# Altium PCB PCI Express Mini L1_V1.PCBDOC (part 2 of 9)
Units mm, origin at the board's own origin, x right, y up, seen from the top; angles counter-clockwise.
Board outline 70 x 83.2 mm, 6 copper layers (TopLayer, Layer 1, Layer 2, Layer 3, Layer 4, Bottom Layer), stack 0.914 mm thick; 442 components, 259 nets, 1412 pads, 857 vias.
Unrouted connection lines stored in the file: 2.
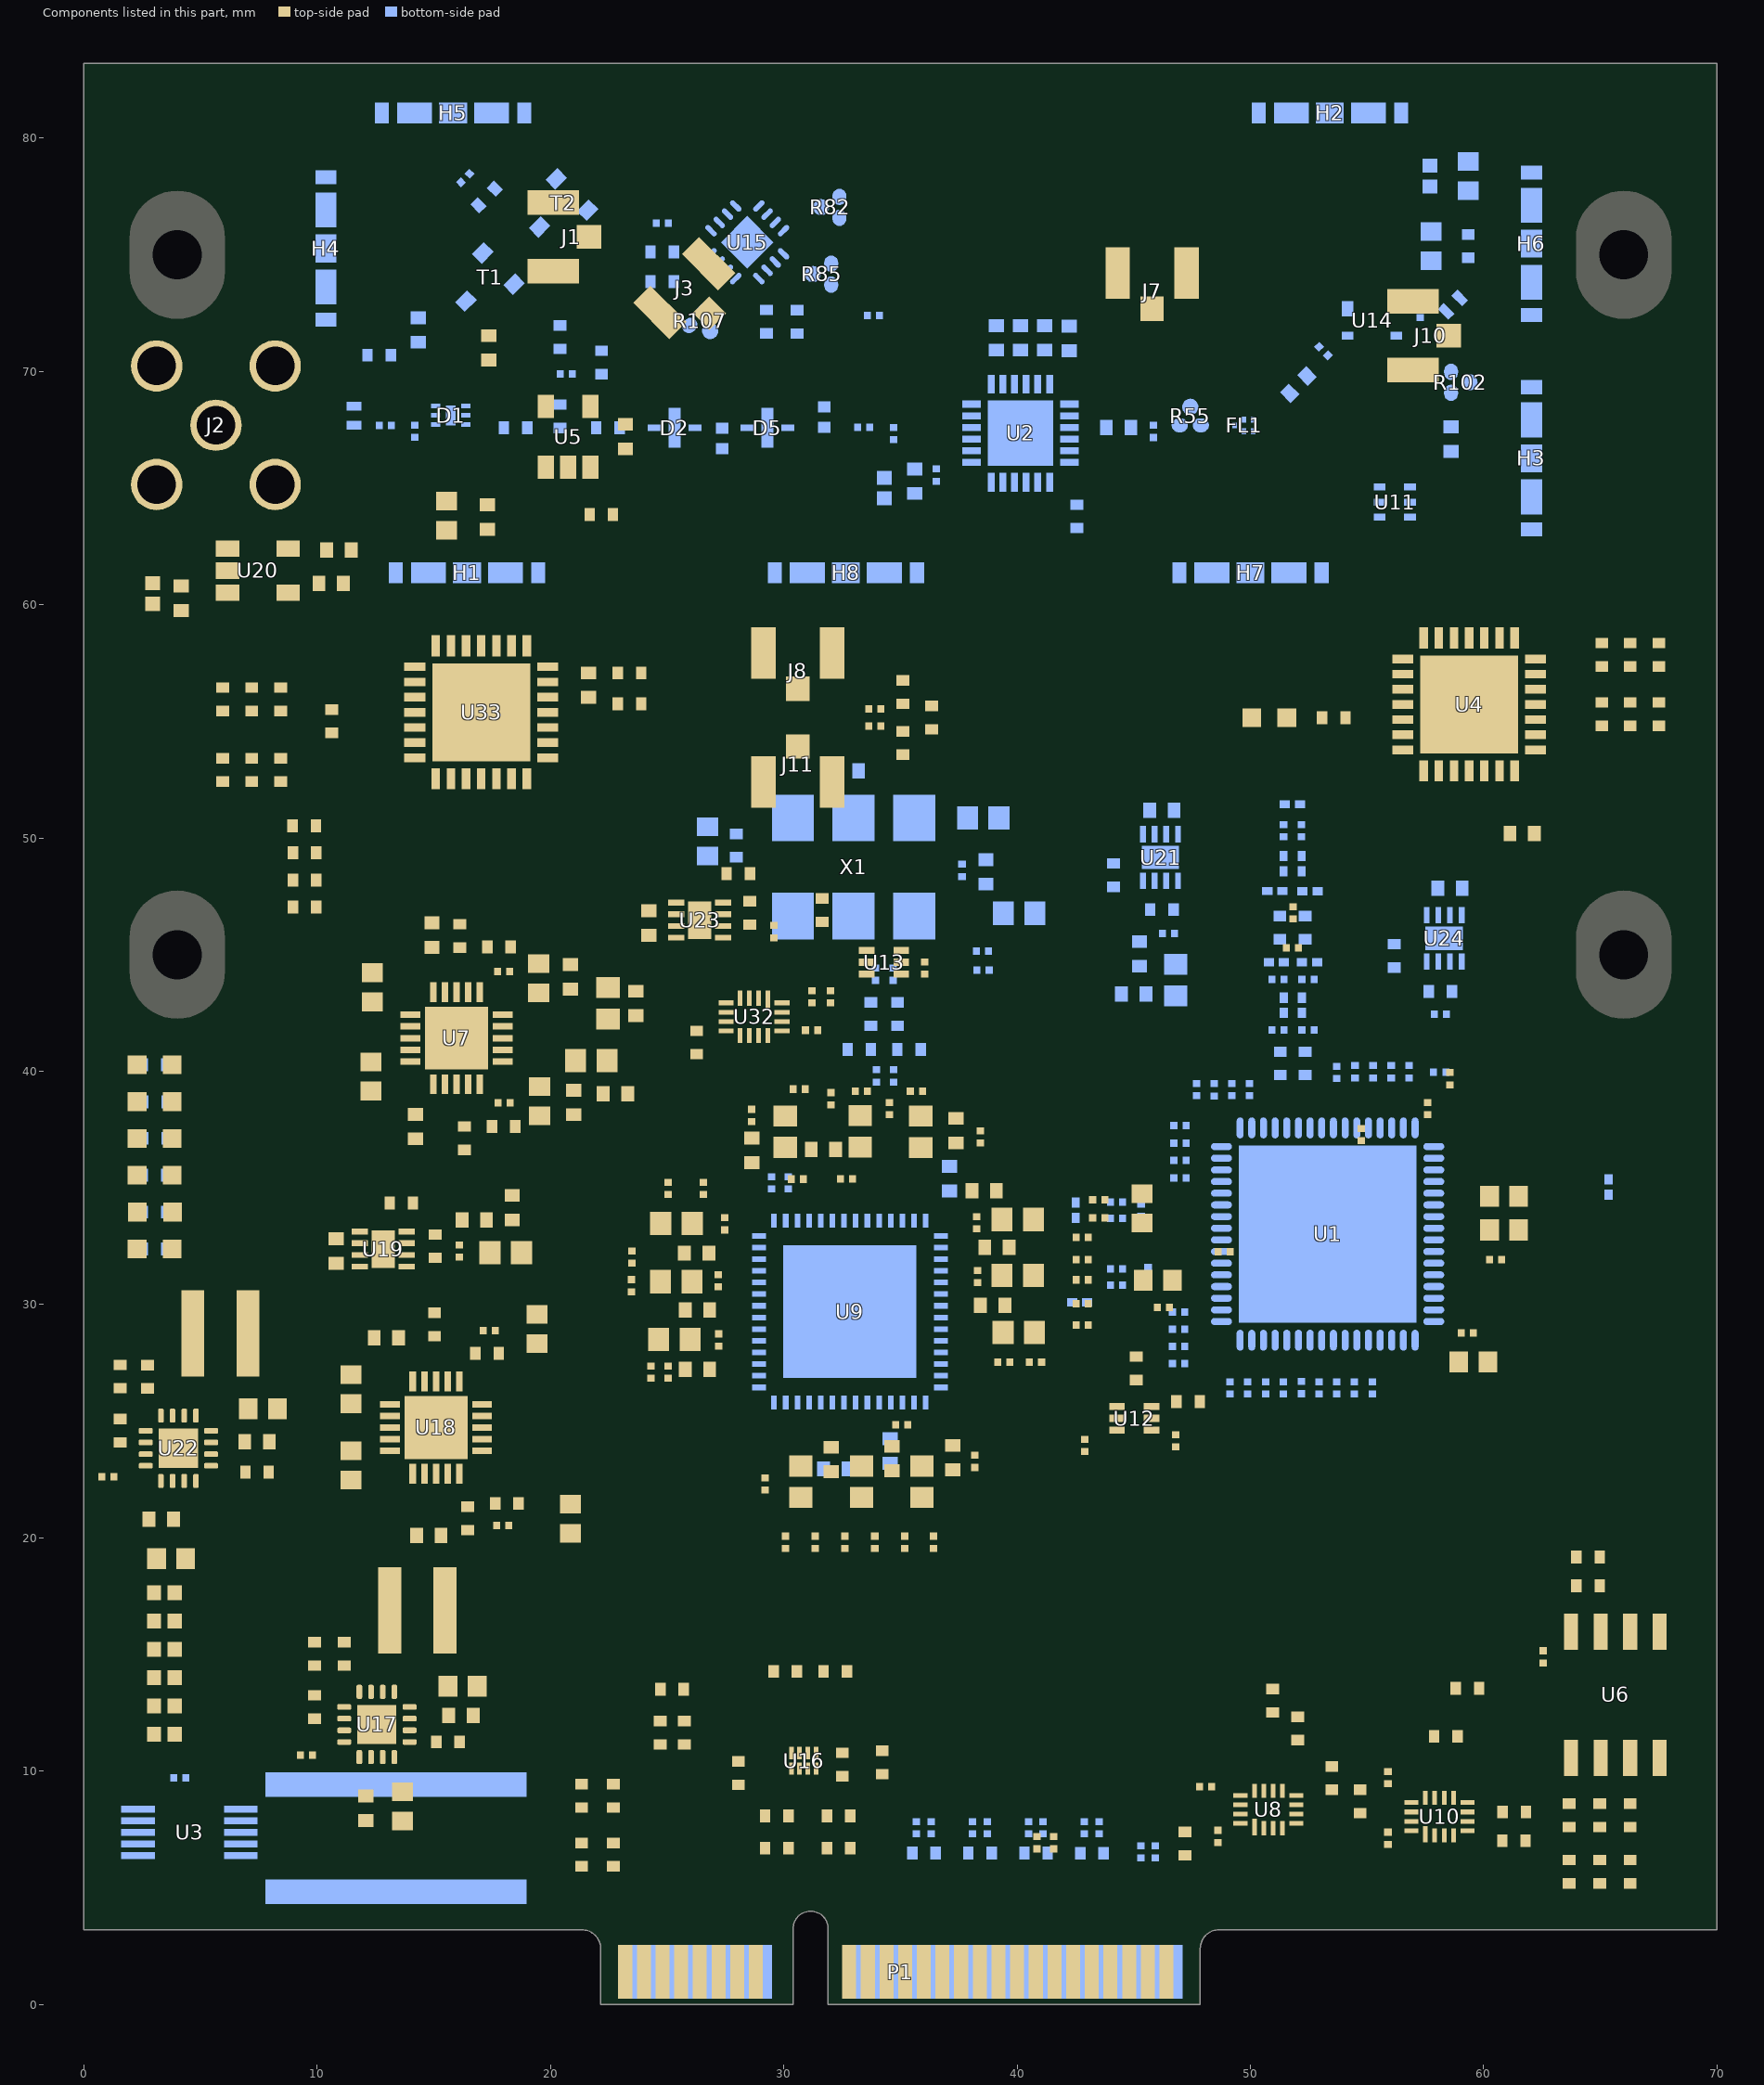
[diagram p6: the components of this part, seen from the top]

## Footprints (in the part's own frame and the unit in brackets; to place one, negate y for a bottom-side part, rotate by r counter-clockwise, add the part's x,y. Pads: shape width x height; smd on the part's side, far side on the other; paste and mask are expansions set on the pad) (continued)
ADL5910 [mm] "16-Lead Lead Frame Chip Scale Package [LFCSP]  3 mm × 3 mm Body and 0.75 mm Package Height  (CP-16-22)"
  oval 0.6x0.23 smd: 1(-1.45,0.75) 2(-1.45,0.25) 3(-1.45,-0.25) 4(-1.45,-0.75) 9(1.45,-0.75) 10(1.45,-0.25) 11(1.45,0.25) 12(1.45,0.75)
  oval 0.23x0.6 smd: 5(-0.75,-1.45) 6(-0.25,-1.45) 7(0.25,-1.45) 8(0.75,-1.45) 13(0.75,1.45) 14(0.25,1.45) 15(-0.25,1.45) 16(-0.75,1.45)
  rect 1.6x1.6 smd paste-0.05: 17(0,0)
  silkscreen extent -2.32,-1.55 1.55,1.55, body extent -1.55,-1.55 1.55,1.55, height 0.8
ADP124_125_KK [mm] "8-Lead Lead Frame Chip Scale Package [LFCSP_UD]  2 mm × 2 mm Body, Ultra Thin, Dual Lead  (CP-8-10)"
  rect 0.7x0.25 smd: 1(-1,0.75) 2(-1,0.25) 3(-1,-0.25) 4(-1,-0.75) 5(1,-0.75) 6(1,-0.25) 7(1,0.25) 8(1,0.75)
  rect 1x1.6 smd: 9(0,0)
  silkscreen extent -1.5,-1.2 1.05,1.25, body extent -1.15,-1.05 1.15,1.05, height 0.55
AP2210K-3.3TRG1 [mm] "SOT23, 5-Leads, Body 2.96x2.83mm, Pitch 0.95mm, IPC High Density"
  rect 1x0.7 smd: 1(-1.3,0.95) 2(-1.3,0) 3(-1.3,-0.95) 4(1.3,-0.95) 5(1.3,0.95)
  silkscreen extent -1.42,-1.55 0.45,1.97, body extent -1.5,-1.55 1.5,1.55, height 1.45
"CAP 0201/0603 KK"#1 [mm] "Chip Capacitor, 2-Leads, Body 0.60x0.30mm, IPC High Density"
  rect 0.3x0.32 smd mask+0.062: 1(-0.26,0) 2(0.26,0)
  silkscreen extent -0.58,-0.33 0.58,0.33, body extent -0.3,-0.15 0.3,0.15, height 0.3
"CAP 0201/0603 KK"#2 [mm] "Chip Capacitor, 2-Leads, Body 0.60x0.30mm, IPC High Density"
  rect 0.3x0.32 smd: 1(-0.26,0) 2(0.26,0)
  silkscreen extent -0.58,-0.33 0.58,0.33, body extent -0.3,-0.15 0.3,0.15, height 0.3
"CAP 0402/1005 RF KK" [mm] "Chip Capacitor, 2-Leads, Body 1.02x0.51mm, IPC High Density"
  rect 0.55x0.65 smd: 1(-0.525,0) 2(0.525,0)
  silkscreen extent -0.87,-0.45 0.87,0.45, body extent -0.5,-0.26 0.5,0.26, height 0.52
"CAP 0603/1608 RF" [mm] "Chip Capacitor, 2-Leads, Body 1.60x0.80mm, IPC High Density"
  rect 0.8x0.9 smd: 1(-0.625,0) 2(0.625,0)
  silkscreen extent -1.2,-0.63 1.2,0.63, body extent -0.8,-0.41 0.8,0.41, height 0.82
CLA4611-085LF [mm] "PSON, 2-Leads, Body 2,00x2,00mm, Pitch 0,00mm, Thermal Pad 1,70x0,50mm, IPC High Density"
  rect 0.55x0.27 smd: 1(0.875,0) 3(-0.875,0)
  rect 0.5x1.7 smd: 2(0,0)
  silkscreen extent -1.6,-1.15 1.15,1.2, body extent -1,-1 1,1, height 1
FCSL110R005FERCT-ND [mm] "Wide 4320 (11050 Metric), 2043"
  rect 1.05x11.2 smd: 1(-2.3,0) 2(2.3,0)
  silkscreen extent -1.4,-5.5 1.4,5.5, body extent -2.8,-5.6 2.8,5.6, height 0.8
"FER 0402/1005 KK" [mm] "Chip Ferrite, 2-Leads, Body 1.02x0.51mm, IPC Medium Density"
  rect 0.6x0.64 smd: 1(-0.44,0) 2(0.44,0)
  silkscreen extent -1,-0.5 1,0.5, body extent -0.5,-0.26 0.5,0.26, height 0.52
"FER 0603/1608 KK" [mm] "Chip Ferrite, 2-Leads, Body 1.60x0.80mm, IPC Medium Density"
  rect 0.9x1 smd: 1(-0.675,0) 2(0.675,0)
  silkscreen extent -1.4,-0.7 1.4,0.7, body extent -0.8,-0.41 0.8,0.41, height 0.82
GPS05605 [mm] "SOT343, 4-Leads, Body 2,00x2,15mm, Pitch 1,30mm, IPC High Density"
  rect 0.5x0.35 smd: 1(-1.05,0.65) 3(1.05,-0.65) 4(1.05,0.65)
  rect 0.5x0.65 smd: 2(-1.05,-0.5)
  silkscreen extent -1.1,-1 0.65,1.17, body extent -1.22,-1 1.22,1, height 0.9
HMC472ALP4E [mm] "24-VFQFN Exposed Pad"
  rect 0.8x0.3 smd mask+0.075: 1(-2.1,1.25) 2(-2.1,0.75) 3(-2.1,0.25) 4(-2.1,-0.25) 5(-2.1,-0.75) 6(-2.1,-1.25) 13(2.1,-1.25) 14(2.1,-0.75) 15(2.1,-0.25) 16(2.1,0.25) 17(2.1,0.75) 18(2.1,1.25)
  rect 0.3x0.8 smd mask+0.075: 7(-1.25,-2.1) 8(-0.75,-2.1) 9(-0.25,-2.1) 10(0.25,-2.1) 11(0.75,-2.1) 12(1.25,-2.1) 19(1.25,2.1) 20(0.75,2.1) 21(0.25,2.1) 22(-0.25,2.1) 23(-0.75,2.1) 24(-1.25,2.1)
  rect 2.8x2.8 smd paste-0.1 mask+0.075: 25(0,0)
  silkscreen extent -2.82,-2.05 2.05,2.05, body extent -2.05,-2.05 2.05,2.05, height 0.39
INA226 [mm] "TSSOP, 10-Leads, Body 3,00x3,00mm, Pitch 0,50mm, IPC Medium Density"
  rect 1.45x0.3 smd: 1(-2.2,1) 2(-2.2,0.5) 3(-2.2,0) 4(-2.2,-0.5) 5(-2.2,-1) 6(2.2,-1) 7(2.2,-0.5) 8(2.2,0) 9(2.2,0.5) 10(2.2,1)
  silkscreen extent -2.32,-1.55 1.15,1.82, body extent -2.45,-1.55 2.45,1.55, height 1.1
"IND 0402/1005 RF WW" [mm]
  rect 0.48x0.54 smd: 1(-0.44,0) 2(0.44,0)
  silkscreen extent -0.87,-0.45 0.87,0.45, body extent -0.5,-0.29 0.5,0.29, height 0.51
"LED 0603/1608 GREEN" [mm] "Chip Diode, 2-Leads, Body 1.60x0.80mm, IPC Medium Density"
  rect 0.8x0.8 smd: 1(-0.75,0) 2(0.75,0)
  silkscreen extent -1.52,-0.7 1.52,0.7, body extent -0.8,-0.4 0.8,0.4, height 0.53
LMK04610 [mm] "PQFN, 56-Leads, Body 8,00x8,00mm, Pitch 0,50mm, Thermal Pad 5,70x5,70mm, IPC High Density"
  rect 0.6x0.24 smd: 1(-3.9,3.25) 2(-3.9,2.75) 3(-3.9,2.25) 4(-3.9,1.75) 5(-3.9,1.25) 6(-3.9,0.75) 7(-3.9,0.25) 8(-3.9,-0.25) 9(-3.9,-0.75) 10(-3.9,-1.25) 11(-3.9,-1.75) 12(-3.9,-2.25) 13(-3.9,-2.75) 14(-3.9,-3.25) 29(3.9,-3.25) 30(3.9,-2.75) 31(3.9,-2.25) 32(3.9,-1.75) 33(3.9,-1.25) 34(3.9,-0.75) 35(3.9,-0.25) 36(3.9,0.25) 37(3.9,0.75) 38(3.9,1.25) 39(3.9,1.75) 40(3.9,2.25) 41(3.9,2.75) 42(3.9,3.25)
  rect 0.24x0.6 smd: 15(-3.25,-3.9) 16(-2.75,-3.9) 17(-2.25,-3.9) 18(-1.75,-3.9) 19(-1.25,-3.9) 20(-0.75,-3.9) 21(-0.25,-3.9) 22(0.25,-3.9) 23(0.75,-3.9) 24(1.25,-3.9) 25(1.75,-3.9) 26(2.25,-3.9) 27(2.75,-3.9) 28(3.25,-3.9) 43(3.25,3.9) 44(2.75,3.9) 45(2.25,3.9) 46(1.75,3.9) 47(1.25,3.9) 48(0.75,3.9) 49(0.25,3.9) 50(-0.25,3.9) 51(-0.75,3.9) 52(-1.25,3.9) 53(-1.75,3.9) 54(-2.25,3.9) 55(-2.75,3.9) 56(-3.25,3.9)
  rect 5.7x5.7 smd paste-2.85 mask+0.102: 57(0,0)
  rect 1.15x1.15 on Bottom Paste: ""(-2.025,-2.025) ""(-2.025,-0.675) ""(-2.025,0.675) ""(-2.025,2.025) ""(-0.675,-2.025) ""(-0.675,-0.675) ""(-0.675,0.675) ""(-0.675,2.025) ""(0.675,-2.025) ""(0.675,-0.675) ""(0.675,0.675) ""(0.675,2.025) ""(2.025,-2.025) ""(2.025,-0.675) ""(2.025,0.675) ""(2.025,2.025)
  silkscreen extent -4.85,-4.08 4.08,4.08, body extent -4.08,-4.08 4.08,4.08, height 1
MCP23017/MCP23S17#1 [mm] "QFN, 28-Leads, Body 6,00x6,00mm, Pitch 0,65mm, Thermal Pad 4,25x4,25mm, IPC High Density"
  rect 0.9x0.37 smd: 1(-2.85,1.95) 2(-2.85,1.3) 3(-2.85,0.65) 4(-2.85,0) 5(-2.85,-0.65) 6(-2.85,-1.3) 7(-2.85,-1.95) 15(2.85,-1.95) 16(2.85,-1.3) 17(2.85,-0.65) 18(2.85,0) 19(2.85,0.65) 20(2.85,1.3) 21(2.85,1.95)
  rect 0.37x0.9 smd: 8(-1.95,-2.85) 9(-1.3,-2.85) 10(-0.65,-2.85) 11(0,-2.85) 12(0.65,-2.85) 13(1.3,-2.85) 14(1.95,-2.85) 22(1.95,2.85) 23(1.3,2.85) 24(0.65,2.85) 25(0,2.85) 26(-0.65,2.85) 27(-1.3,2.85) 28(-1.95,2.85)
  rect 4.2x4.2 smd: 29(0,0)
  silkscreen extent -3.92,-3.15 3.15,3.15, body extent -3,-3 3,3, height 1
MCP23017/MCP23S17#2 [mm] "QFN, 28-Leads, Body 6,00x6,00mm, Pitch 0,65mm, Thermal Pad 4,25x4,25mm, IPC High Density"
  rect 0.9x0.37 smd: 1(-2.85,1.95) 2(-2.85,1.3) 3(-2.85,0.65) 4(-2.85,0) 5(-2.85,-0.65) 6(-2.85,-1.3) 7(-2.85,-1.95) 15(2.85,-1.95) 16(2.85,-1.3) 17(2.85,-0.65) 18(2.85,0) 19(2.85,0.65) 20(2.85,1.3) 21(2.85,1.95)
  rect 0.37x0.9 smd: 8(-1.95,-2.85) 9(-1.3,-2.85) 10(-0.65,-2.85) 11(0,-2.85) 12(0.65,-2.85) 13(1.3,-2.85) 14(1.95,-2.85) 22(1.95,2.85) 23(1.3,2.85) 24(0.65,2.85) 25(0,2.85) 26(-0.65,2.85) 27(-1.3,2.85) 28(-1.95,2.85)
  rect 4.2x4.2 smd paste-2.125: 29(0,0)
  silkscreen extent -3.93,-3.15 3.15,3.15, body extent -3,-3 3,3, height 1
ODS-1415 [mm]
  rect 0.4x0.2 smd: 1(-0.65,0.4) 2(-0.65,0) 3(-0.65,-0.4) 4(0.65,-0.4) 5(0.65,0) 6(0.65,0.4)
  rect 0.42x0.85 smd: 7(0,0)
  silkscreen extent -1.11,0.66 -1.01,0.76, body extent -0.75,-0.6 0.75,0.6, height 0.6
PCA9306 [mm] "8-XFDFN, Body 1,40x1,00mm, Pitch 0,35mm, IPC High Density"
  rect 0.53x0.2 smd: 1(-0.335,0.525) 2(-0.335,0.175) 3(-0.335,-0.175) 4(-0.335,-0.525) 5(0.335,-0.525) 6(0.335,-0.175) 7(0.335,0.175) 8(0.335,0.525)
  silkscreen extent -0.86,0.79 -0.76,0.89, body extent -0.53,-0.73 0.53,0.72, height 0.4
PCIeMini-GF-2D-800-1K-S52 [mm] "Golden finger, PCIeMini, Dual, Staggered, Pitch 0.8mm, 52-Position"
  rect 0.6x2.3 smd paste-0.9: 1(-11.8,0) 3(-11,0) 5(-10.2,0) 7(-9.4,0) 9(-8.6,0) 11(-7.8,0) 13(-7,0) 15(-6.2,0) 17(-2.2,0) 19(-1.4,0) 21(-0.6,0) 23(0.2,0) 25(1,0) 27(1.8,0) 29(2.6,0) 31(3.4,0) 33(4.2,0) 35(5,0) 37(5.8,0) 39(6.6,0) 41(7.4,0) 43(8.2,0) 45(9,0) 47(9.8,0) 49(10.6,0) 51(11.4,0)
  rect 0.6x2.3 smd far side paste-0.9: 2(-11.4,0) 4(-10.6,0) 6(-9.8,0) 8(-9,0) 10(-8.2,0) 12(-7.4,0) 14(-6.6,0) 16(-5.8,0) 18(-1.8,0) 20(-1,0) 22(-0.2,0) 24(0.6,0) 26(1.4,0) 28(2.2,0) 30(3,0) 32(3.8,0) 34(4.6,0) 36(5.4,0) 38(6.2,0) 40(7,0) 42(7.8,0) 44(8.6,0) 46(9.4,0) 48(10.2,0) 50(11,0) 52(11.8,0)
"RES 0201/0603"#1 [mm] "Chip Resistor, 2-Leads, Body 0.60x0.30mm, IPC Medium Density"
  rect 0.44x0.35 smd mask+0.055: 1(-0.325,0) 2(0.325,0)
  silkscreen extent -0.7,-0.33 0.7,0.33, body extent -0.3,-0.15 0.3,0.15, height 0.21
"RES 0201/0603"#2 [mm]
  rect 0.44x0.35 smd: 1(-0.325,0) 2(0.325,0)
  silkscreen extent -0.7,-0.33 0.7,0.33, body extent -0.3,-0.15 0.3,0.15, height 0.21
"RES 0402/1005 RF - 3-PADS"#1 [mm] "Chip Resistor, 2-Leads, Body 1.0x0.5mm, IPC High Density"
  oval 0.7x0.6 smd: 1(-0.45,0) 2(0.45,0)
  round 0.7 smd: 3(0,0.787)
  silkscreen extent -1.02,-0.5 1.02,1.34, body extent -0.5,-0.25 0.5,0.25, height 0.35
"RES 0402/1005 RF - 3-PADS"#2 [mm] "Chip Resistor, 2-Leads, Body 1.0x0.5mm, IPC High Density"
  oval 0.7x0.6 smd: 1(-0.45,0) 2(0.45,0)
  round 0.7 smd paste-2: 3(0,0.787)
  silkscreen extent -1.02,-0.5 1.02,1.34, body extent -0.5,-0.25 0.5,0.25, height 0.35
"RES 0402/1005 RF KK" [mm] "Chip Resistor, 2-Leads, Body 1.0x0.5mm, IPC High Density"
  rect 0.45x0.55 smd: 1(-0.5,0) 2(0.5,0)
  silkscreen extent -1.02,-0.51 1.02,0.51, body extent -0.5,-0.25 0.5,0.25, height 0.35
ROS-32K101-400L5_V [mm] "SMA Straight Jack, 6.35x6.35x9.5mm, Rosenberger Recommended"
  round 2.2 hole 1.65: 1(0,0) MH(-2.54,-2.54) MH(-2.54,2.54) MH(2.54,-2.54) MH(2.54,2.54)
  silkscreen extent -3.17,-3.18 3.18,3.17, body extent -3.17,-3.17 3.18,3.18, height 9.5
SI2342DS-T1-GE3 [mm] "SOT23, 3-Leads, Body 2,92x2,37mm, Pitch 0,95mm, IPC High Density"
  rect 0.724x0.6 smd: 1(-0.984,0.95) 2(-0.984,-0.95) 3(0.984,0)
  silkscreen extent -1.11,-1.5 0.7,1.92, body extent -1.32,-1.52 1.32,1.52, height 1.12
TA1954A [mm] "5-Leads, Body 0,90x1,10mm"
  rect 0.2x0.25 smd: A(0.4,0) B(0,-0.25) C(-0.4,-0.25) D(-0.4,0.25) E(0,0.25)
  silkscreen extent -0.55,-0.6 0.93,0.6, body extent -0.55,-0.45 0.55,0.45, height 0.95
TECO-1909763-1_V [mm] "SMD, 3-Leads, Body 2.6x2.6mm, Height 1.25mm"
  rect 1.05x2.2 smd: 1(-1.475,0) 3(1.475,0)
  rect 1x1.05 smd: 2(0,-1.525)
  silkscreen extent -1.9,-1.78 0.55,1.3, body extent -1.5,-1.55 1.5,1.55, height 1.25
TPS7A88 [mm] "RTJ (S-PWQFN-N20) 20-Leads, Body 4,00x4,00mm, Pitch 0,50mm, Thermal Pad 2,70x2,70mm, IPC High Density"
  rect 0.85x0.28 smd: 1(-1.975,1) 2(-1.975,0.5) 3(-1.975,0) 4(-1.975,-0.5) 5(-1.975,-1) 11(1.975,-1) 12(1.975,-0.5) 13(1.975,0) 14(1.975,0.5) 15(1.975,1)
  rect 0.28x0.85 smd: 6(-1,-1.975) 7(-0.5,-1.975) 8(0,-1.975) 9(0.5,-1.975) 10(1,-1.975) 16(1,1.975) 17(0.5,1.975) 18(0,1.975) 19(-0.5,1.975) 20(-1,1.975)
  rect 2.7x2.7 smd: 21(0,0)
  silkscreen extent -2.85,-2.07 2.07,2.07, body extent -2.07,-2.07 2.07,2.07, height 0.8
TXB0304 [mm] "RSV0016A UQFN - 0.55 mm max height"
  rect 0.75x0.2 smd: 1(-0.75,0.6)
  rect 0.65x0.2 smd: 2(-0.8,0.2) 3(-0.8,-0.2) 4(-0.8,-0.6) 9(0.8,-0.6) 10(0.8,-0.2) 11(0.8,0.2) 12(0.8,0.6)
  rect 0.2x0.65 smd: 5(-0.6,-1.2) 6(-0.2,-1.2) 7(0.2,-1.2) 8(0.6,-1.2) 13(0.6,1.2) 14(0.2,1.2) 15(-0.2,1.2) 16(-0.6,1.2)
  silkscreen extent -1.27,1.58 -1.18,1.68, body extent -0.92,-1.33 0.92,1.33, height 0.55
VG-4513CA [mm] "SON, 6-Leads, Body 7,00x5,00mm, Pitch 2,60mm, IPC High Density"
  rect 2x1.8 smd: 1(-2.1,2.6) 2(-2.1,0) 3(-2.1,-2.6) 4(2.1,-2.6) 5(2.1,0) 6(2.1,2.6)
  silkscreen extent -3.36,3.66 -3.26,3.76, body extent -2.6,-3.6 2.6,3.6, height 1.8
VQFN50P300x300-16-EPAD [mm] "VQFN"
  rrect50% 0.6x0.24 smd mask+0.07: 1(-1.4,0.75) 2(-1.4,0.25) 3(-1.4,-0.25) 4(-1.4,-0.75) 9(1.4,-0.75) 10(1.4,-0.25) 11(1.4,0.25) 12(1.4,0.75)
  rrect50% 0.24x0.6 smd mask+0.07: 5(-0.75,-1.4) 6(-0.25,-1.4) 7(0.25,-1.4) 8(0.75,-1.4) 13(0.75,1.4) 14(0.25,1.4) 15(-0.25,1.4) 16(-0.75,1.4)
  rect 1.68x1.68 smd paste-0.075: 17(0,0)
  silkscreen extent -2.32,-1.55 1.55,1.55, body extent -1.55,-1.55 1.55,1.55, height 1
WE-KI_0402 [mm] "SMD Wire Wound Ceramic Inductor, body 1x0.55mm"
  rect 0.375x0.65 smd: 1(-0.412,0) 2(0.413,0)
  body extent -0.5,-0.27 0.5,0.28, height 0.58
WE-MAPI_4030 [mm] "SMT Shielded Power Inductor, body 4.1x4.1mm"
  rect 0.98x3.7 smd: 1(-1.185,0) 2(1.185,0)
  silkscreen extent -2.15,-2.15 2.15,2.15, body extent -2.05,-2.05 2.05,2.05, height 3.1

## Part data
C1 C7: library part Capacitor, Case Code (Imperial)=0201, Case Code (Metric)=0603, Dielectric=C0G, Manufacturer 1=Murata, Manufacturer Part Number 1=GJM0335C1E4R0CB01D, Max Operating Temperature=125°C, Min Operating Temperature=-55°C, Package Quantity=1, Supplier Part Number 1=490-3068-1-ND, Voltage Rating=25V, Capacitance=4pF, Case/Package=0201, ComponentLink1Description=https://datasheet.ciiva.com/133/product-133426.pdf?src-supplier=Digi-Key, ComponentLink1URL=https://datasheet.ciiva.com/133/product-133426.pdf?src-supplier=Digi-Key, ComponentLink2Description=https://datasheet.ciiva.com/133/partnumbering-e-01-133427.pdf?src-supplier=Digi-Key, ComponentLink2URL=https://datasheet.ciiva.com/133/partnumbering-e-01-133427.pdf?src-supplier=Digi-Key, ComponentLink3Description=https://datasheet.ciiva.com/133/partnumbering-e-01-133428.pdf?src-supplier=Digi-Key, ComponentLink3URL=https://datasheet.ciiva.com/133/partnumbering-e-01-133428.pdf?src-supplier=Digi-Key, ComponentLink4Description=https://datasheet.ciiva.com/16467/l0005e-16467449.pdf?src-supplier=Future+Electronics, ComponentLink4URL=https://datasheet.ciiva.com/16467/l0005e-16467449.pdf?src-supplier=Future+Electronics, ComponentLink5Description=https://datasheet.ciiva.com/11613/product-11613563.pdf?src-supplier=Avnet, ComponentLink5URL=https://datasheet.ciiva.com/11613/product-11613563.pdf?src-supplier=Avnet, Depth=0.3mm, Height=0.3mm, Lead Free="Lead Free", Length=0.6mm, Mount="Surface Mount", Packaging="Tape and Reel", Pricing 1="1=0.10000, 10=0.07300, 100=0.03240, 500=0.02318, 1000=0.01821, 2500=0.01655, 5000=0.01523 (USD)", Radiation Hardening=No, RoHS=Yes, Stock 1=33697, Supplier 1=Digi-Key, Termination=SMD/SMT, Thickness=0.013inch, Voltage Rating (DC)=25V, Width=0.012inch
C2 C5 C8: library part Capacitor, Case Code (Imperial)=0201, Case Code (Metric)=0603, Dielectric=C0G, Manufacturer 1=Murata, Manufacturer Part Number 1=GRM0335C1E1R0CA01D, Max Operating Temperature=125°C, Min Operating Temperature=-55°C, Package Quantity=15000, Supplier Part Number 1=490-7749-1-ND, Voltage Rating=25V, Capacitance=1pF, Case/Package=0201, ComponentLink1Description=https://datasheet.ciiva.com/29540/partnumbering-e-01-29540585.pdf?src-supplier=Digi-Key, ComponentLink1URL=https://datasheet.ciiva.com/29540/partnumbering-e-01-29540585.pdf?src-supplier=Digi-Key, ComponentLink2Description=https://datasheet.ciiva.com/29540/partnumbering-e-01-29540586.pdf?src-supplier=Digi-Key, ComponentLink2URL=https://datasheet.ciiva.com/29540/partnumbering-e-01-29540586.pdf?src-supplier=Digi-Key, ComponentLink3Description=https://datasheet.ciiva.com/29540/partnumbering-e-01-29540587.pdf?src-supplier=Digi-Key, ComponentLink3URL=https://datasheet.ciiva.com/29540/partnumbering-e-01-29540587.pdf?src-supplier=Digi-Key, Depth=0.3mm, Height=0.3mm, Lead Free="Lead Free", Length=0.6mm, Mount="Surface Mount", Packaging="Tape and Reel", Pricing 1="1=0.10000, 10=0.01500, 100=0.00680, 500=0.00484, 1000=0.00380, 2500=0.00345, 5000=0.00317 (USD)", REACH SVHC="No SVHC", RoHS=Yes, Stock 1=33122, Supplier 1=Digi-Key, Termination=SMD/SMT, Thickness=0.013inch, Voltage Rating (DC)=25V, Width=0.012inch
C3 C4 C6 C41 C44 C45 C53 C56 C175 C176 C178 C179 C183 C185 C186 C187 C188 C189 C223 C224 C225 C226 C227 C228: library part Capacitor, Case Code (Imperial)=0201, Case Code (Metric)=0603, Dielectric=X5R, Manufacturer 1=Yageo, Manufacturer Part Number 1=CC0201KRX5R6BB104, Max Operating Temperature=85°C, Min Operating Temperature=-55°C, Supplier Part Number 1=311-1593-1-ND, Tolerance=10%, Voltage Rating=10V, Capacitance=100nF, Case/Package=0201, ComponentLink1Description=https://datasheet.ciiva.com/17437/upy-gphc-x5r-4v-to-50v-12-17437495.pdf?src-supplier=Avnet+Europe, ComponentLink1URL=https://datasheet.ciiva.com/17437/upy-gphc-x5r-4v-to-50v-12-17437495.pdf?src-supplier=Avnet+Europe, ComponentLink2Description=https://datasheet.ciiva.com/11587/upy-gphc-x5r-4v-to-50v-12-11587190.pdf?src-supplier=Avnet, ComponentLink2URL=https://datasheet.ciiva.com/11587/upy-gphc-x5r-4v-to-50v-12-11587190.pdf?src-supplier=Avnet, Composition=Ceramic, Depth=0.3mm, Halogen Free="Halogen Free", Height=0.3mm, Lead Free="Lead Free", Length=0.6mm, Mount="Surface Mount", Packaging="Tape and Reel", Pricing 1="1=0.10000, 10=0.03800, 100=0.01690, 500=0.01208, 1000=0.00949, 2500=0.00862, 5000=0.00794 (USD)", Radiation Hardening=No, RoHS=Yes, Stock 1=1229391, Supplier 1=Digi-Key, Termination=SMD/SMT, Thickness=0.013inch, Voltage Rating (DC)=10V, Weight=6E-06oz, Width=0.012inch
C9 C15 C16 C17 C18 C19 C20 C23 C26 C35 C36 C38 C39 C50 C69 C84 C85 C88 C89 C94 C95 C99 C100 C101 C102 C103 C104 C105 C106 C107 C108 C109 C110 C111 C113 C114 C115 C116 C117 C118 C119 C120 C121 C122 C123 C124 C125 C132 C133 C134 C136 C137 C138 C139 C150 C151 C152 C154 C155 C156 C158 C159 C160 C162 C163 C164 C166 C167 C174 C181 C182 C184 C191 C192 C193 C195 C196 C197 C199 C200 C201 C203 C204 C205 C207 C208 C209 C211 C212 C213 C215 C216 C217 C239 C240 C243 C244: library part Capacitor, Case Code (Imperial)=0201, Case Code (Metric)=0603, Dielectric=X5R, Manufacturer 1=Murata, Manufacturer Part Number 1=GRM033R61C104ME84D, Max Operating Temperature=85°C, Min Operating Temperature=-55°C, Package Quantity=15000, Supplier Part Number 1=490-9986-1-ND, Tolerance=20%, Voltage Rating=16V, Capacitance=100nF, Case/Package=0201, Height=0.3mm, Length=0.024inch, Mount="Surface Mount", Packaging="Tape and Reel", Pricing 1="1=0.10000, 10=0.05400, 100=0.02430, 500=0.01732, 1000=0.01361, 2500=0.01238, 5000=0.01139 (USD)", RoHS=Yes, Supplier 1=Digi-Key, Termination=SMD/SMT, Thickness=0.013inch, Voltage Rating (DC)=16V, Weight=1.2E-05oz, Width=0.3mm
  C9 C19 C20 C23 C26 C94 C95 C132 C133 C134 C136 C137 C138 C139 C239 C240 C243 C244: ComponentLink1Description=http://www.mouser.com/ds/2/281/c02e-2905.pdf?src-supplier=Mouser, ComponentLink1URL=http://www.mouser.com/ds/2/281/c02e-2905.pdf?src-supplier=Mouser, ComponentLink2Description=http://search.murata.co.jp/Ceramy/image/img/A01X/G101/ENG/GRM033R61C104ME84-01.pdf?src-supplier=Digi-Key, ComponentLink2URL=http://search.murata.co.jp/Ceramy/image/img/A01X/G101/ENG/GRM033R61C104ME84-01.pdf?src-supplier=Digi-Key, Stock 1=550070
  C15 C16 C17 C18 C35 C36 C38 C39: ComponentLink1Description=http://www.mouser.com/ds/2/281/c02e-2905.pdf?src-supplier=Mouser, ComponentLink1URL=http://www.mouser.com/ds/2/281/c02e-2905.pdf?src-supplier=Mouser, ComponentLink2Description=http://search.murata.co.jp/Ceramy/image/img/A01X/G101/ENG/GRM033R61C104ME84-01.pdf?src-supplier=Digi-Key, ComponentLink2URL=http://search.murata.co.jp/Ceramy/image/img/A01X/G101/ENG/GRM033R61C104ME84-01.pdf?src-supplier=Digi-Key, Stock 1=502660
  C50 C84 C85 C150 C151 C152 C154 C155 C156 C158 C159 C160 C162 C163 C164 C166 C167 C174 C181 C182 C184 C191 C192 C193 C195 C196 C197 C199 C200 C201 C203 C204 C205 C207 C208 C209 C211 C212 C213 C215 C216 C217: ComponentLink1Description=http://www.mouser.com/ds/2/281/c02e-2905.pdf?src-supplier=Mouser, ComponentLink1URL=http://www.mouser.com/ds/2/281/c02e-2905.pdf?src-supplier=Mouser, ComponentLink2Description=http://search.murata.co.jp/Ceramy/image/img/A01X/G101/ENG/GRM033R61C104ME84-01.pdf?src-supplier=Digi-Key, ComponentLink2URL=http://search.murata.co.jp/Ceramy/image/img/A01X/G101/ENG/GRM033R61C104ME84-01.pdf?src-supplier=Digi-Key, Stock 1=503570
  C69 C88 C89 C99 C100 C101 C102 C103 C104 C105 C106 C107 C108 C109 C110 C111 C113 C114 C115 C116 C117 C118 C119 C120 C121 C122 C123 C124 C125: ComponentLink1Description=http://search.murata.co.jp/Ceramy/image/img/A01X/G101/ENG/GRM033R61C104KE84-01.pdf?src-supplier=Digi-Key, ComponentLink1URL=http://search.murata.co.jp/Ceramy/image/img/A01X/G101/ENG/GRM033R61C104KE84-01.pdf?src-supplier=Digi-Key, ComponentLink2Description=https://search.murata.co.jp/Ceramy/image/img/A01X/G101/ENG/GRM033R61C104KE84-01.pdf?src-supplier=Digi-Key, ComponentLink2URL=https://search.murata.co.jp/Ceramy/image/img/A01X/G101/ENG/GRM033R61C104KE84-01.pdf?src-supplier=Digi-Key, ComponentLink3Description=http://www.mouser.com/ds/2/281/c02e-2905.pdf?src-supplier=Mouser, ComponentLink3URL=http://www.mouser.com/ds/2/281/c02e-2905.pdf?src-supplier=Mouser, ComponentLink4Description=http://search.murata.co.jp/Ceramy/image/img/A01X/G101/ENG/GRM033R61C104ME84-01.pdf?src-supplier=Digi-Key, ComponentLink4URL=http://search.murata.co.jp/Ceramy/image/img/A01X/G101/ENG/GRM033R61C104ME84-01.pdf?src-supplier=Digi-Key, Stock 1=550070
C10 C153 C157 C161 C165 C171 C172 C173 C180 C190 C194 C198 C202 C206 C210 C214 C218: library part Capacitor, "CAP CER 10UF 10V X5R 0402", Case Code (Imperial)=0402, Case Code (Metric)=1005, Manufacturer=Samsung, Manufacturer Part Number=CL05A106MP8NUB8, Max Operating Temperature=85°C, Min Operating Temperature=-55°C, Supplier Part Number 1=1276-6830-1-ND, Tolerance=20%, Voltage Rating=10V, Capacitance=10uF, Case/Package=0402, Category="Ceramic Capacitors", ComponentLink1Description=http://www.samsungsem.com/kr/support/product-search/mlcc/CL05A106MP8NUB8.jsp?src-supplier=Digi-Key, ComponentLink1URL=http://www.samsungsem.com/kr/support/product-search/mlcc/CL05A106MP8NUB8.jsp?src-supplier=Digi-Key, Length=0.039inch, Mount="Surface Mount", Packaging="Tape and Reel", Pricing 1="1=0,40000, 10=0,27900, 50=0,19500, 100=0,16710, 500=0,12534, 1000=0,10584, 2500=0,10027 (USD)", RoHS=Yes, Stock 1=1457006, Supplier 1=Digi-Key, Thickness=0.035inch, Width=0.02inch
C11 C12 C13 C14: library part Capacitor, Case/Package=0402, Dielectric=C0G, Manufacturer 1="Walsin Technologies", Manufacturer Part Number 1=0402N331F500CT, Max Operating Temperature=125°C, Min Operating Temperature=-55°C, Supplier Part Number 1=1292-1307-1-ND, Tolerance=1%, Capacitance=330pF, ComponentLink1Description=http://components.arrow.com/part/dataview/0323_06535843?src-supplier=Arrow+Europe, ComponentLink1URL=http://components.arrow.com/part/dataview/0323_06535843?src-supplier=Arrow+Europe, ComponentLink2Description=http://www.passivecomponent.com/indexsea/0402N331F500CT-IN.pdf?src-supplier=Digi-Key, ComponentLink2URL=http://www.passivecomponent.com/indexsea/0402N331F500CT-IN.pdf?src-supplier=Digi-Key, Depth=0.5mm, Length=1mm, Packaging="Tape and Reel", Pricing 1="1=0.12000, 10=0.09000, 100=0.04030, 500=0.02876, 1000=0.02260, 2500=0.02054, 5000=0.01890 (USD)", RoHS=Yes, Stock 1=23341, Supplier 1=Digi-Key
C21 C22 C82 C83 C252 C253 C256 C257 C259: library part Capacitor, "Multilayer Ceramic Capacitors MLCC - SMD/SMT 0201 100pF 25volts C0G +/-5%", Case Code (Imperial)=0201, Case Code (Metric)=0603, Dielectric=C0G, Manufacturer=Murata, Manufacturer Part Number=GRM0335C1E101JA01D, Max Operating Temperature=125°C, Min Operating Temperature=-55°C, Package Quantity=15000, Supplier Part Number 1=490-3160-1-ND, Tolerance=5%, Voltage=25V, Capacitance=100pF, Case/Package=0201, Category="Ceramic Capacitors", ComponentLink1Description=https://datasheet.ciiva.com/16497/grm0335c1e101ja01-01-16497112.pdf?src-supplier=Future+Electronics, ComponentLink1URL=https://datasheet.ciiva.com/16497/grm0335c1e101ja01-01-16497112.pdf?src-supplier=Future+Electronics, ComponentLink2Description=https://datasheet.ciiva.com/18697/product-18697797.pdf?src-supplier=Digi-Key, ComponentLink2URL=https://datasheet.ciiva.com/18697/product-18697797.pdf?src-supplier=Digi-Key, Depth=0.3mm, Height=0.3mm, Lead Free="Lead Free", Length=0.6mm, Mount="Surface Mount", Packaging="Tape and Reel", Pricing 1="1=0,10000, 10=0,01300, 100=0,00560, 500=0,00400, 1000=0,00315, 2500=0,00286, 5000=0,00263 (USD)", Radiation Hardening=No, REACH SVHC="No SVHC", RoHS=Yes, Stock 1=270262, Supplier 1=Digi-Key, Termination=SMD/SMT, Thickness=0.013inch, Voltage Rating=25V, Voltage Rating (DC)=25V, Width=0.012inch
C24 C61: library part Capacitor, "MURATA - GRM155R61A225KE95D - Keramikvielschichtkondensator, SMD, 2.2 µF, 10 V, 0402 [Metrisch 1005], ± 10%, X5R, Baureihe GRM", Case Code (Imperial)=0402, Case Code (Metric)=1005, Dielectric=X5R, Manufacturer=Murata, Manufacturer Part Number=GRM155R61A225KE95D, Max Operating Temperature=85°C, Min Operating Temperature=-55°C, Package Quantity=10000, Supplier Part Number 1=490-10451-1-ND, Tolerance=10%, Voltage Rating=10V, Capacitance=2.2uF, Case/Package=0402, Category="Ceramic Capacitors", ComponentLink1Description=http://www.mouser.com/ds/2/281/c02e-2905.pdf?src-supplier=Mouser, ComponentLink1URL=http://www.mouser.com/ds/2/281/c02e-2905.pdf?src-supplier=Mouser, ComponentLink2Description=http://components.arrow.com/part/dataview/0323_04264073?src-supplier=Arrow+Europe, ComponentLink2URL=http://components.arrow.com/part/dataview/0323_04264073?src-supplier=Arrow+Europe, ComponentLink3Description=http://www.farnell.com/datasheets/1872202.pdf?src-supplier=Farnell, ComponentLink3URL=http://www.farnell.com/datasheets/1872202.pdf?src-supplier=Farnell, ComponentLink4Description=http://www.farnell.com/datasheets/2047915.pdf?src-supplier=Farnell, ComponentLink4URL=http://www.farnell.com/datasheets/2047915.pdf?src-supplier=Farnell, ComponentLink5Description=http://www.farnell.com/datasheets/1872202.pdf?src-supplier=Element14, ComponentLink5URL=http://www.farnell.com/datasheets/1872202.pdf?src-supplier=Element14, ComponentLink6Description=http://www.farnell.com/datasheets/1872202.pdf?src-supplier=Newark, ComponentLink6URL=http://www.farnell.com/datasheets/1872202.pdf?src-supplier=Newark, ComponentLink7Description=http://psearch.en.murata.com/capacitor/product/GRM155R61A225KE95%23.pdf?src-supplier=Avnet, ComponentLink7URL=http://psearch.en.murata.com/capacitor/product/GRM155R61A225KE95%23.pdf?src-supplier=Avnet, ComponentLink8Description=http://www.farnell.com/datasheets/2047915.pdf?src-supplier=Element14, ComponentLink8URL=http://www.farnell.com/datasheets/2047915.pdf?src-supplier=Element14, ComponentLink9Description=https://search.murata.co.jp/Ceramy/image/img/A01X/G101/ENG/GRM155R61A225KE95-01.pdf?src-supplier=Digi-Key, ComponentLink9URL=https://search.murata.co.jp/Ceramy/image/img/A01X/G101/ENG/GRM155R61A225KE95-01.pdf?src-supplier=Digi-Key, ComponentLink10Description=http://www.farnell.com/datasheets/2047915.pdf?src-supplier=Newark, ComponentLink10URL=http://www.farnell.com/datasheets/2047915.pdf?src-supplier=Newark, Depth=0.5mm, Height=0.5mm, Lead Free="Lead Free", Length=1mm, Material=Ceramic, Mount="Surface Mount", Packaging="Tape and Reel", Pricing 1="1=0,11000, 10=0,07700, 50=0,04380, 100=0,03630, 500=0,02546, 1000=0,02108, 2500=0,01962, 5000=0,01795 (USD)", REACH SVHC="No SVHC", RoHS=Yes, Stock 1=502318, Supplier 1=Digi-Key, Termination=SMD/SMT, Thickness=0.022inch, Voltage Rating (DC)=10V, Weight=0.000212oz, Width=0.5mm
C25 C28 C32: library part Capacitor, Case/Package=0402, Dielectric=C0G, Dielectric Material=Ceramic, Manufacturer 1=KEMET, Manufacturer Part Number 1=C0402C330J5GACTU, Max Operating Temperature=125°C, Min Operating Temperature=-55°C, Supplier Part Number 1=399-1017-1-ND, Temperature Coefficient=30ppm/°C, Tolerance=5%, Voltage=50V, Capacitance=33pF, ComponentLink1Description=https://datasheet.ciiva.com/45846/kem-c1003-c0g-smd-45846921.pdf?src-supplier=Onlinecomponents.com, ComponentLink1URL=https://datasheet.ciiva.com/45846/kem-c1003-c0g-smd-45846921.pdf?src-supplier=Onlinecomponents.com, Depth=0.5mm, Height=0.5mm, Lead Free="Lead Free", Length=1mm, Mount="Surface Mount", Packaging="Tape and Reel", Pricing 1="1=0.10000, 10=0.03900, 100=0.01740, 500=0.01240, 1000=0.00974, 2500=0.00886, 5000=0.00815 (USD)", Radiation Hardening=No, RoHS=Yes, Stock 1=690392, Supplier 1=Digi-Key, Termination=SMD/SMT, Voltage Rating (DC)=50V
C27 C40 C42 C43 C46 C52 C54 C55 C57 C73 C74 C79 C80 C81 C87: library part Capacitor, "Cap Ceramic 10uF 25V X5R 20% Pad SMD 0603 85C T/R", Case Code (Imperial)=0603, Case Code (Metric)=1608, Manufacturer="Taiyo Yuden", Manufacturer Part Number=TMK107BBJ106MA-T, Max Operating Temperature=85°C, Min Operating Temperature=-55°C, Supplier Part Number 1=587-6023-1-ND, Tolerance=20%, Voltage Rating=25V, Capacitance=10uF, Case/Package=0603, Category="Ceramic Capacitors", ComponentLink1Description=http://ds.yuden.co.jp/TYCOMPAS/ut/detail.do?productNo=TMK107BBJ106MA-T&fileName=TMK107BBJ106MA-T_SS&mode=specSheetDownload&src-supplier=Digi-Key, ComponentLink1URL=http://ds.yuden.co.jp/TYCOMPAS/ut/detail.do?productNo=TMK107BBJ106MA-T&fileName=TMK107BBJ106MA-T_SS&mode=specSheetDownload&src-supplier=Digi-Key, Lead Free="Lead Free", Mount="Surface Mount", Packaging="Tape and Reel", Pricing 1="1=0,44000, 10=0,30600, 50=0,21400, 100=0,18350, 500=0,13762, 1000=0,11620 (USD)", RoHS=No, Stock 1=261658, Supplier 1=Digi-Key
C29 C90: library part Capacitor, "CAP CER 0.1UF 25V X5R 0402", Case Code (Imperial)=0402, Case Code (Metric)=1005, Dielectric=X5R, Manufacturer="Taiyo Yuden", Manufacturer Part Number=TMK105BJ104KV-F, Max Operating Temperature=85°C, Min Operating Temperature=-55°C, Package Quantity=1, Resistor Type=Ceramic, Supplier Part Number 1=587-1456-1-ND, Tolerance=10%, Voltage=25V, Capacitance=100nF, Case/Package=0402, Category="Ceramic Capacitors", ComponentLink1Description=https://datasheet.ciiva.com/30051/25tmk105bj104kv-f-30051094.pdf?src-supplier=Onlinecomponents.com, ComponentLink1URL=https://datasheet.ciiva.com/30051/25tmk105bj104kv-f-30051094.pdf?src-supplier=Onlinecomponents.com, ComponentLink2Description=https://datasheet.ciiva.com/15922/28tmk105bj104kv-f-15922315.pdf?src-supplier=Onlinecomponents.com, ComponentLink2URL=https://datasheet.ciiva.com/15922/28tmk105bj104kv-f-15922315.pdf?src-supplier=Onlinecomponents.com, ComponentLink3Description=https://datasheet.ciiva.com/131/tmk105bj104kv-f-ss-131420.pdf?src-supplier=Digi-Key, ComponentLink3URL=https://datasheet.ciiva.com/131/tmk105bj104kv-f-ss-131420.pdf?src-supplier=Digi-Key, ComponentLink4Description=https://datasheet.ciiva.com/22768/1693457-22768649.pdf?src-supplier=Farnell, ComponentLink4URL=https://datasheet.ciiva.com/22768/1693457-22768649.pdf?src-supplier=Farnell, Depth=0.5mm, Halogen Free="Halogen Free", Height=0.5mm, Lead Free="Lead Free", Length=1mm, Mount="Surface Mount", Number of Pins=2, Packaging="Tape and Reel", Pricing 1="1=0,10000, 10=0,04000, 50=0,02180, 100=0,01780, 500=0,01270, 1000=0,00998, 2500=0,00908, 5000=0,00835 (USD)", REACH SVHC="No SVHC", RoHS=Yes, Stock 1=15317616, Supplier 1=Digi-Key, Termination=SMD/SMT, Thickness=0.022inch, Voltage Rating=25V, Voltage Rating (DC)=25V, Weight=2.3E-05oz, Width=0.5mm
C30: library part Capacitor, "CAP CER 560PF 50V C0G/NP0 0402", Case Code (Imperial)=0402, Case Code (Metric)=1005, Dielectric=C0G, Manufacturer=Murata, Manufacturer Part Number=GRM1555C1H561JA01D, Max Operating Temperature=125°C, Min Operating Temperature=-55°C, Package Quantity=1, Supplier Part Number 1=490-3238-1-ND, Temperature Coefficient=30ppm/°C, Tolerance=5%, Voltage=50V, Capacitance=560pF, Case/Package=0402, Category="Ceramic Capacitors", ComponentLink1Description=https://datasheet.ciiva.com/131/product-131968.pdf?src-supplier=Digi-Key, ComponentLink1URL=https://datasheet.ciiva.com/131/product-131968.pdf?src-supplier=Digi-Key, ComponentLink2Description=https://datasheet.ciiva.com/18184/getdatasheetpartid-178878-18184424.pdf?src-supplier=Verical, ComponentLink2URL=https://datasheet.ciiva.com/18184/getdatasheetpartid-178878-18184424.pdf?src-supplier=Verical, ComponentLink3Description=https://datasheet.ciiva.com/11789/0900766b80ef921d-11789215.pdf?src-supplier=RSComponents, ComponentLink3URL=https://datasheet.ciiva.com/11789/0900766b80ef921d-11789215.pdf?src-supplier=RSComponents, ComponentLink4Description=https://datasheet.ciiva.com/29199/453938-da-01-en-vs-kondensator-0402-29199858.pdf?src-supplier=Conrad, ComponentLink4URL=https://datasheet.ciiva.com/29199/453938-da-01-en-vs-kondensator-0402-29199858.pdf?src-supplier=Conrad, ComponentLink5Description=https://datasheet.ciiva.com/14116/grmseries-tc-hitype-eng-14116839.pdf?src-supplier=Distrelec, ComponentLink5URL=https://datasheet.ciiva.com/14116/grmseries-tc-hitype-eng-14116839.pdf?src-supplier=Distrelec, Depth=0.5mm, Height=0.5mm, Lead Free="Lead Free", Length=1mm, Material=Ceramic, Mount="Surface Mount", Packaging="Tape and Reel", Pricing 1="1=0,12000, 10=0,08300, 50=0,04680, 100=0,03880, 500=0,02720, 1000=0,02253, 2500=0,02096, 5000=0,01918 (USD)", Radiation Hardening=No, REACH SVHC="No SVHC", RoHS=Yes, Stock 1=630084, Supplier 1=Digi-Key, Termination=SMD/SMT, Thickness=0.022inch, Voltage Rating=50V, Voltage Rating (DC)=50V, Width=0.02inch
C31 C33: library part Capacitor, "YAGEO - CC0603KRX7R9BB471 - Multilayer Ceramic Capacitor, CC Series, 470 pF, - 10%, X7R, 50 V, 0603 [1608 Metric] RoHS Compliant: Yes", Case Code (Imperial)=0603, Case Code (Metric)=1608, Dielectric=X7R, Dielectric Material=Ceramic, Insulation Resistance=10GR, Manufacturer=Yageo, Manufacturer Part Number=CC0603KRX7R9BB471, Max Operating Temperature=125°C, Min Operating Temperature=-55°C, Package Quantity=1, Supplier Part Number 1=311-1078-1-ND, Tolerance=10%, Voltage Rating=50V, Capacitance=470pF, Case/Package=0603, Category="Ceramic Capacitors", ComponentLink1Description=https://datasheet.ciiva.com/5425/upy-gphc-x7r-6-3v-to-50v-8-12304-5425461.pdf?src-supplier=Mouser, ComponentLink1URL=https://datasheet.ciiva.com/5425/upy-gphc-x7r-6-3v-to-50v-8-12304-5425461.pdf?src-supplier=Mouser, ComponentLink2Description=https://datasheet.ciiva.com/144/mlccorderingcode-144439.pdf?src-supplier=Digi-Key, ComponentLink2URL=https://datasheet.ciiva.com/144/mlccorderingcode-144439.pdf?src-supplier=Digi-Key, ComponentLink3Description=https://datasheet.ciiva.com/144/mlccorderingcode-144440.pdf?src-supplier=Digi-Key, ComponentLink3URL=https://datasheet.ciiva.com/144/mlccorderingcode-144440.pdf?src-supplier=Digi-Key, ComponentLink4Description=https://datasheet.ciiva.com/11587/upy-gphc-x7r-6-3v-to-50v-8-11587224.pdf?src-supplier=Avnet, ComponentLink4URL=https://datasheet.ciiva.com/11587/upy-gphc-x7r-6-3v-to-50v-8-11587224.pdf?src-supplier=Avnet, ComponentLink5Description=https://datasheet.ciiva.com/144/mlccorderingcode-144441.pdf?src-supplier=Digi-Key, ComponentLink5URL=https://datasheet.ciiva.com/144/mlccorderingcode-144441.pdf?src-supplier=Digi-Key, ComponentLink6Description=https://datasheet.ciiva.com/16623/upy-gphc-x7r-6-3v-to-50v-8-16623897.pdf?src-supplier=Avnet+Europe, ComponentLink6URL=https://datasheet.ciiva.com/16623/upy-gphc-x7r-6-3v-to-50v-8-16623897.pdf?src-supplier=Avnet+Europe, ComponentLink7Description=https://datasheet.ciiva.com/8033/1489800-8033898.pdf?src-supplier=Element14, ComponentLink7URL=https://datasheet.ciiva.com/8033/1489800-8033898.pdf?src-supplier=Element14, ComponentLink8Description=https://datasheet.ciiva.com/8033/1489800-8033899.pdf?src-supplier=Element14, ComponentLink8URL=https://datasheet.ciiva.com/8033/1489800-8033899.pdf?src-supplier=Element14, ComponentLink9Description=https://datasheet.ciiva.com/26829/getdatasheetpartid-251791-26829452.pdf?src-supplier=Verical, ComponentLink9URL=https://datasheet.ciiva.com/26829/getdatasheetpartid-251791-26829452.pdf?src-supplier=Verical, ComponentLink10Description=https://datasheet.ciiva.com/28450/1489800-28450652.pdf?src-supplier=Element14, ComponentLink10URL=https://datasheet.ciiva.com/28450/1489800-28450652.pdf?src-supplier=Element14, ComponentLink11Description=https://datasheet.ciiva.com/8033/70765-8033902.pdf?src-supplier=Element14, ComponentLink11URL=https://datasheet.ciiva.com/8033/70765-8033902.pdf?src-supplier=Element14, Depth=0.8mm, Dissipation Factor=2.5%, Halogen Free="Halogen Free", Height=0.8mm, Lead Free="Lead Free", Length=1.6mm, Mount="Surface Mount", Number of Pins=2, Packaging="Tape and Reel", Pricing 1="1=0,10000, 10=0,05000, 50=0,02720, 100=0,02230, 500=0,01590, 1000=0,01249 (USD)", Radiation Hardening=No, REACH SVHC="No SVHC", Resistor Type=Ceramic, RoHS=Yes, Stock 1=42824, Supplier 1=Digi-Key, Termination=SMD/SMT, Thickness=0.035inch, Voltage Rating (DC)=50V, Width=0.8mm
C34 C63: library part Capacitor, Case Code (Imperial)=0402, Case Code (Metric)=1005, Dielectric=X7R, Manufacturer 1="Kyocera AVX", Manufacturer Part Number 1=04025C101KAT2A, Max Operating Temperature=125°C, Min Operating Temperature=-55°C, Package Quantity=1, Supplier Part Number 1=478-1089-1-ND, Tolerance=10%, Voltage=50V, Capacitance=100pF, Case/Package=0402, ComponentLink1Description=https://datasheet.ciiva.com/34303/1928935-34303276.pdf?src-supplier=Jameco, ComponentLink1URL=https://datasheet.ciiva.com/34303/1928935-34303276.pdf?src-supplier=Jameco, ComponentLink2Description=https://datasheet.ciiva.com/151/cx7r-151045.pdf?src-supplier=Digi-Key, ComponentLink2URL=https://datasheet.ciiva.com/151/cx7r-151045.pdf?src-supplier=Digi-Key, ComponentLink3Description=https://datasheet.ciiva.com/22619/1679506-22619749.pdf?src-supplier=Element14, ComponentLink3URL=https://datasheet.ciiva.com/22619/1679506-22619749.pdf?src-supplier=Element14, ComponentLink4Description=https://datasheet.ciiva.com/151/cx7r-151046.pdf?src-supplier=Digi-Key, ComponentLink4URL=https://datasheet.ciiva.com/151/cx7r-151046.pdf?src-supplier=Digi-Key, ComponentLink5Description=https://datasheet.ciiva.com/5415/cx7r-218113-5415051.pdf?src-supplier=Mouser, ComponentLink5URL=https://datasheet.ciiva.com/5415/cx7r-218113-5415051.pdf?src-supplier=Mouser, ComponentLink6Description=https://datasheet.ciiva.com/28586/1818074-28586573.pdf?src-supplier=Element14, ComponentLink6URL=https://datasheet.ciiva.com/28586/1818074-28586573.pdf?src-supplier=Element14, ComponentLink7Description=https://datasheet.ciiva.com/151/cx7r-151047.pdf?src-supplier=Digi-Key, ComponentLink7URL=https://datasheet.ciiva.com/151/cx7r-151047.pdf?src-supplier=Digi-Key, ComponentLink8Description=https://datasheet.ciiva.com/28453/1679506-28453959.pdf?src-supplier=Element14, ComponentLink8URL=https://datasheet.ciiva.com/28453/1679506-28453959.pdf?src-supplier=Element14, ComponentLink9Description=https://datasheet.ciiva.com/28586/1679506-28586589.pdf?src-supplier=Element14, ComponentLink9URL=https://datasheet.ciiva.com/28586/1679506-28586589.pdf?src-supplier=Element14, ComponentLink10Description=https://datasheet.ciiva.com/16287/cx7r-16287262.pdf?src-supplier=Future+Electronics, ComponentLink10URL=https://datasheet.ciiva.com/16287/cx7r-16287262.pdf?src-supplier=Future+Electronics, Depth=0.5mm, Lead Free="Lead Free", Length=1mm, Mount="Surface Mount", Number of Pins=2, Packaging="Tape and Reel", Pricing 1="1=0.10000, 10=0.06000, 100=0.02650, 500=0.01894, 1000=0.01488, 2500=0.01353, 5000=0.01245 (USD)", Radiation Hardening=No, REACH SVHC="No SVHC", RoHS=Yes, Stock 1=434421, Supplier 1=Digi-Key, Termination=SMD/SMT, Thickness=0.022inch, Voltage Rating=50V, Voltage Rating (DC)=50V, Width=0.02inch
C37: library part Capacitor, "TAIYO YUDEN - EMK107ABJ475MA-T - SMD Multilayer Ceramic Capacitor, 4.7 µF, 16 V, 0603 [1608 Metric], ± 20%, X5R, M Series", Case/Package=Ceramic, Dielectric=X5R, Manufacturer="Taiyo Yuden", Manufacturer Part Number=EMK107ABJ475MA-T, Max Operating Temperature=85°C, Min Operating Temperature=-55°C, Supplier Part Number 1=587-6003-1-ND, Tolerance=20%, Voltage=16V, Capacitance=4.7uF, Category="Ceramic Capacitors", ComponentLink1Description=https://datasheet.ciiva.com/26871/getdatasheetpartid-637315-26871304.pdf?src-supplier=Verical, ComponentLink1URL=https://datasheet.ciiva.com/26871/getdatasheetpartid-637315-26871304.pdf?src-supplier=Verical, Depth=0.8mm, Height=0.8mm, Lead Free="Lead Free", Length=1.6mm, Mount="Surface Mount", Packaging="Tape and Reel", Pricing 1="1=0,28000, 10=0,19200, 50=0,12820, 100=0,10900, 500=0,07696, 1000=0,06734 (USD)", Radiation Hardening=No, RoHS=Yes, Stock 1=5, Supplier 1=Digi-Key
C47 C51 C58 C59: library part Capacitor, "Multilayer Ceramic Capacitors MLCC - SMD/SMT 1.0uF 10V X5R 20%", Case Code (Imperial)=0402, Case Code (Metric)=1005, Dielectric=X5R, Manufacturer=Yageo, Manufacturer Part Number=CC0402MRX5R6BB105, Max Operating Temperature=85°C, Min Operating Temperature=-55°C, Supplier Part Number 1=311-1732-1-ND, Tolerance=20%, Voltage Rating=10V, Capacitance=1uF, Case/Package=0402, Category="Ceramic Capacitors", ComponentLink1Description=http://www.mouser.com/ds/2/447/UPY-GPHC_X5R_4V-to-50V_24-1109650.pdf?src-supplier=Mouser, ComponentLink1URL=http://www.mouser.com/ds/2/447/UPY-GPHC_X5R_4V-to-50V_24-1109650.pdf?src-supplier=Mouser, ComponentLink2Description=http://www.yageo.com/documents/recent/UPY-GPHC_X5R_4V-to-50V_25.pdf?src-supplier=Digi-Key, ComponentLink2URL=http://www.yageo.com/documents/recent/UPY-GPHC_X5R_4V-to-50V_25.pdf?src-supplier=Digi-Key, ComponentLink3Description=http://www.yageo.com/documents/recent/UPY-GPHC_X5R_4V-to-50V-16.pdf?src-supplier=Future+Electronics, ComponentLink3URL=http://www.yageo.com/documents/recent/UPY-GPHC_X5R_4V-to-50V-16.pdf?src-supplier=Future+Electronics, Composition=Ceramic, Dissipation Factor=10%, Halogen Free="Halogen Free", Height=0.5mm, Lead Free="Lead Free", Length=0.039inch, Mount="Surface Mount", Number of Pins=2, Packaging="Tape and Reel", Pricing 1="1=0,13000, 10=0,09300, 50=0,05280, 100=0,04380, 500=0,03074, 1000=0,02544, 2500=0,02368, 5000=0,02166 (USD)", RoHS=Yes, Stock 1=109526, Supplier 1=Digi-Key, Termination=SMD/SMT, Thickness=0.022inch, Voltage Rating (DC)=10V, Width=0.02inch
C48: library part Capacitor, "Cap Ceramic 22uF 10V X5R 20% SMD 0603 85°C Embossed T/R", Case Code (Imperial)=0603, Case Code (Metric)=1608, Manufacturer=Samsung, Manufacturer Part Number=CL10A226MPMNUBE, Max Operating Temperature=85°C, Min Operating Temperature=-55°C, Supplier Part Number 1=1276-6751-1-ND, Tolerance=20%, Voltage Rating=10V, Capacitance=22uF, Case/Package=0603, Category="Ceramic Capacitors", ComponentLink1Description=http://www.samsungsem.com/kr/support/product-search/mlcc/CL10A226MPMNUBE.jsp?src-supplier=Digi-Key, ComponentLink1URL=http://www.samsungsem.com/kr/support/product-search/mlcc/CL10A226MPMNUBE.jsp?src-supplier=Digi-Key, Length=0.063inch, Mount="Surface Mount", Packaging="Tape and Reel", Pricing 1="1=0,33000, 10=0,22500, 50=0,15000, 100=0,12750, 500=0,09002, 1000=0,07877 (USD)", RoHS=Yes, Stock 1=298661, Supplier 1=Digi-Key, Thickness=0.049inch, Width=0.031inch
C49 C92: library part Capacitor, "Multilayer Ceramic Capacitors MLCC - SMD/SMT 4.7uF 10V X5R +/-20% 0402 Gen Purp", Case Code (Imperial)=0402, Case Code (Metric)=1005, Dielectric=X5R, Manufacturer="Taiyo Yuden", Manufacturer Part Number=LMK105BBJ475MVLF, Max Operating Temperature=85°C, Min Operating Temperature=-55°C, Package Quantity=10000, Resistor Type=Ceramic, Supplier Part Number 1=587-3408-1-ND, Tolerance=20%, Voltage Rating=10V, Capacitance=4.7uF, Case/Package=0402, Category="Ceramic Capacitors", ComponentLink1Description=https://datasheet.ciiva.com/24462/423lmk105bbj475mvlf-24462535.pdf?src-supplier=Onlinecomponents.com, ComponentLink1URL=https://datasheet.ciiva.com/24462/423lmk105bbj475mvlf-24462535.pdf?src-supplier=Onlinecomponents.com, ComponentLink2Description=https://datasheet.ciiva.com/18697/mlcc-all-e-18697685.pdf?src-supplier=Digi-Key, ComponentLink2URL=https://datasheet.ciiva.com/18697/mlcc-all-e-18697685.pdf?src-supplier=Digi-Key, ComponentLink3Description=https://datasheet.ciiva.com/18697/mlcc-all-e-18697686.pdf?src-supplier=Digi-Key, ComponentLink3URL=https://datasheet.ciiva.com/18697/mlcc-all-e-18697686.pdf?src-supplier=Digi-Key, Halogen Free="Halogen Free", Height=0.5mm, Length=1mm, Mount="Surface Mount", Packaging="Tape and Reel", Pricing 1="1=0,20000, 10=0,13800, 50=0,08260, 100=0,06980, 500=0,04776, 1000=0,04225, 2500=0,04042, 5000=0,03674 (USD)", RoHS=Yes, Stock 1=146297, Supplier 1=Digi-Key, Termination=SMD/SMT, Thickness=0.022inch, Voltage Rating (DC)=10V, Weight=2.3E-05oz, Width=0.02inch
C60 C62 C65 C70 C96 C126 C241 C242: library part Capacitor, "MURATA - GRT155R61E105KE01D - SMD Multilayer Ceramic Capacitor, 1 µF, 25 V, 0402 [1005 Metric], ± 10%, X5R, GRT Series - SMD Multilayer Ceramic Capacitor, 1 µF, 25 V, 0402 [1005 Metric], ± 10%, X5R, GRT Series", Case Code (Imperial)=0402, Case Code (Metric)=1005, Dielectric=X5R, Manufacturer=Murata, Manufacturer Part Number=GRT155R61E105KE01D, Max Operating Temperature=85°C, Min Operating Temperature=-55°C, Ratings=AEC-Q200, Supplier Part Number 1=490-12263-1-ND, Tolerance=10%, Voltage Rating=25V, Capacitance=1uF, Case/Package=0402, Category="Ceramic Capacitors", ComponentLink1Description=http://www.farnell.com/datasheets/2165918.pdf?src-supplier=Farnell, ComponentLink1URL=http://www.farnell.com/datasheets/2165918.pdf?src-supplier=Farnell, ComponentLink2Description=http://search.murata.co.jp/Ceramy/image/img/A01X/G101/ENG/GRT155R61E105KE01-01.pdf?src-supplier=Digi-Key, ComponentLink2URL=http://search.murata.co.jp/Ceramy/image/img/A01X/G101/ENG/GRT155R61E105KE01-01.pdf?src-supplier=Digi-Key, ComponentLink3Description=http://www.farnell.com/datasheets/2165918.pdf?src-supplier=Element14, ComponentLink3URL=http://www.farnell.com/datasheets/2165918.pdf?src-supplier=Element14, Length=0.039inch, Mount="Surface Mount", Packaging="Tape and Reel", Pricing 1="1=0,18000, 10=0,12300, 100=0,06210, 500=0,04248, 1000=0,03758, 2500=0,03594, 5000=0,03268 (USD)", RoHS=Yes, Stock 1=341453, Supplier 1=Digi-Key, Thickness=0.022inch, Voltage Rating (DC)=25V, Width=0.02inch
C64 C66 C97 C127: library part Capacitor, "Cap Ceramic 1uF 16V X5R 20% Pad SMD 0201 85C T/R", Case Code (Imperial)=0201, Case Code (Metric)=0603, Manufacturer=Samsung, Manufacturer Part Number=CL03A105MO3NRNH, Max Operating Temperature=85°C, Min Operating Temperature=-55°C, Supplier Part Number 1=1276-6798-1-ND, Tolerance=20%, Voltage Rating=16V, Capacitance=1uF, Case/Package=0201, Category="Ceramic Capacitors", ComponentLink1Description=http://www.samsungsem.com/kr/support/product-search/mlcc/CL03A105MO3NRNH.jsp?src-supplier=Digi-Key, ComponentLink1URL=http://www.samsungsem.com/kr/support/product-search/mlcc/CL03A105MO3NRNH.jsp?src-supplier=Digi-Key, Length=0.024inch, Mount="Surface Mount", Packaging="Tape and Reel", Pricing 1="1=0,28000, 10=0,19000, 50=0,11380, 100=0,09610, 500=0,06578, 1000=0,05819, 2500=0,05566, 5000=0,05060 (USD)", RoHS=Yes, Stock 1=520370, Supplier 1=Digi-Key, Thickness=0.013inch, Width=0.012inch
C67 C68 C71 C72 C75 C76 C77 C78: library part Capacitor, Case Code (Imperial)=0402, Case Code (Metric)=1005, Manufacturer 1=Murata, Manufacturer Part Number 1=GRM155R61A475MEAAD, Max Operating Temperature=85°C, Min Operating Temperature=-55°C, Supplier Part Number 1=490-14306-1-ND, Tolerance=20%, Voltage Rating=10V, Capacitance=4.7uF, Case/Package=0402, ComponentLink1Description=http://www.farnell.com/datasheets/2189109.pdf?src-supplier=Farnell, ComponentLink1URL=http://www.farnell.com/datasheets/2189109.pdf?src-supplier=Farnell, ComponentLink2Description=https://search.murata.co.jp/Ceramy/image/img/A01X/G101/ENG/GRM155R61A475MEAA-01.pdf?src-supplier=Digi-Key, ComponentLink2URL=https://search.murata.co.jp/Ceramy/image/img/A01X/G101/ENG/GRM155R61A475MEAA-01.pdf?src-supplier=Digi-Key, ComponentLink3Description=http://datasheet.octopart.com/GRM155R61A475MEAAD-Murata-datasheet-68589269.pdf?src-supplier=Newark, ComponentLink3URL=http://datasheet.octopart.com/GRM155R61A475MEAAD-Murata-datasheet-68589269.pdf?src-supplier=Newark, ComponentLink4Description=http://datasheet.octopart.com/GRM155R61A475MEAAD-Murata-datasheet-8819587.pdf, ComponentLink4URL=http://datasheet.octopart.com/GRM155R61A475MEAAD-Murata-datasheet-8819587.pdf, ComponentLink5Description=http://datasheet.octopart.com/GRM155R61A475MEAAD-Murata-datasheet-10025737.pdf, ComponentLink5URL=http://datasheet.octopart.com/GRM155R61A475MEAAD-Murata-datasheet-10025737.pdf, ComponentLink6Description=http://datasheet.octopart.com/GRM155R61A475MEAAD-Murata-datasheet-11978611.pdf, ComponentLink6URL=http://datasheet.octopart.com/GRM155R61A475MEAAD-Murata-datasheet-11978611.pdf, ComponentLink7Description=http://datasheet.octopart.com/GRM155R61A475MEAAD-Murata-datasheet-12510076.pdf, ComponentLink7URL=http://datasheet.octopart.com/GRM155R61A475MEAAD-Murata-datasheet-12510076.pdf, ComponentLink8Description=http://datasheet.octopart.com/GRM155R61A475MEAAD-Murata-datasheet-12515295.pdf, ComponentLink8URL=http://datasheet.octopart.com/GRM155R61A475MEAAD-Murata-datasheet-12515295.pdf, Mount="Surface Mount", Packaging="Tape and Reel", Pricing 1="1=0.23000, 10=0.15400, 100=0.07780, 500=0.05322, 1000=0.04708, 2500=0.04504, 5000=0.04094 (USD)", Stock 1=1535315, Supplier 1=Digi-Key